# Altium PCB Zotino.PCBDOC (part 2 of 10)
Units mm, origin at the board's own origin, x right, y up, seen from the top; angles counter-clockwise.
Board outline 160.1 x 100.1 mm, 4 copper layers (TopLayer, Internal Plane 2, Signal Layer 1, BottomLayer), stack 1.563 mm thick; 759 components, 378 nets, 2272 pads, 779 vias.
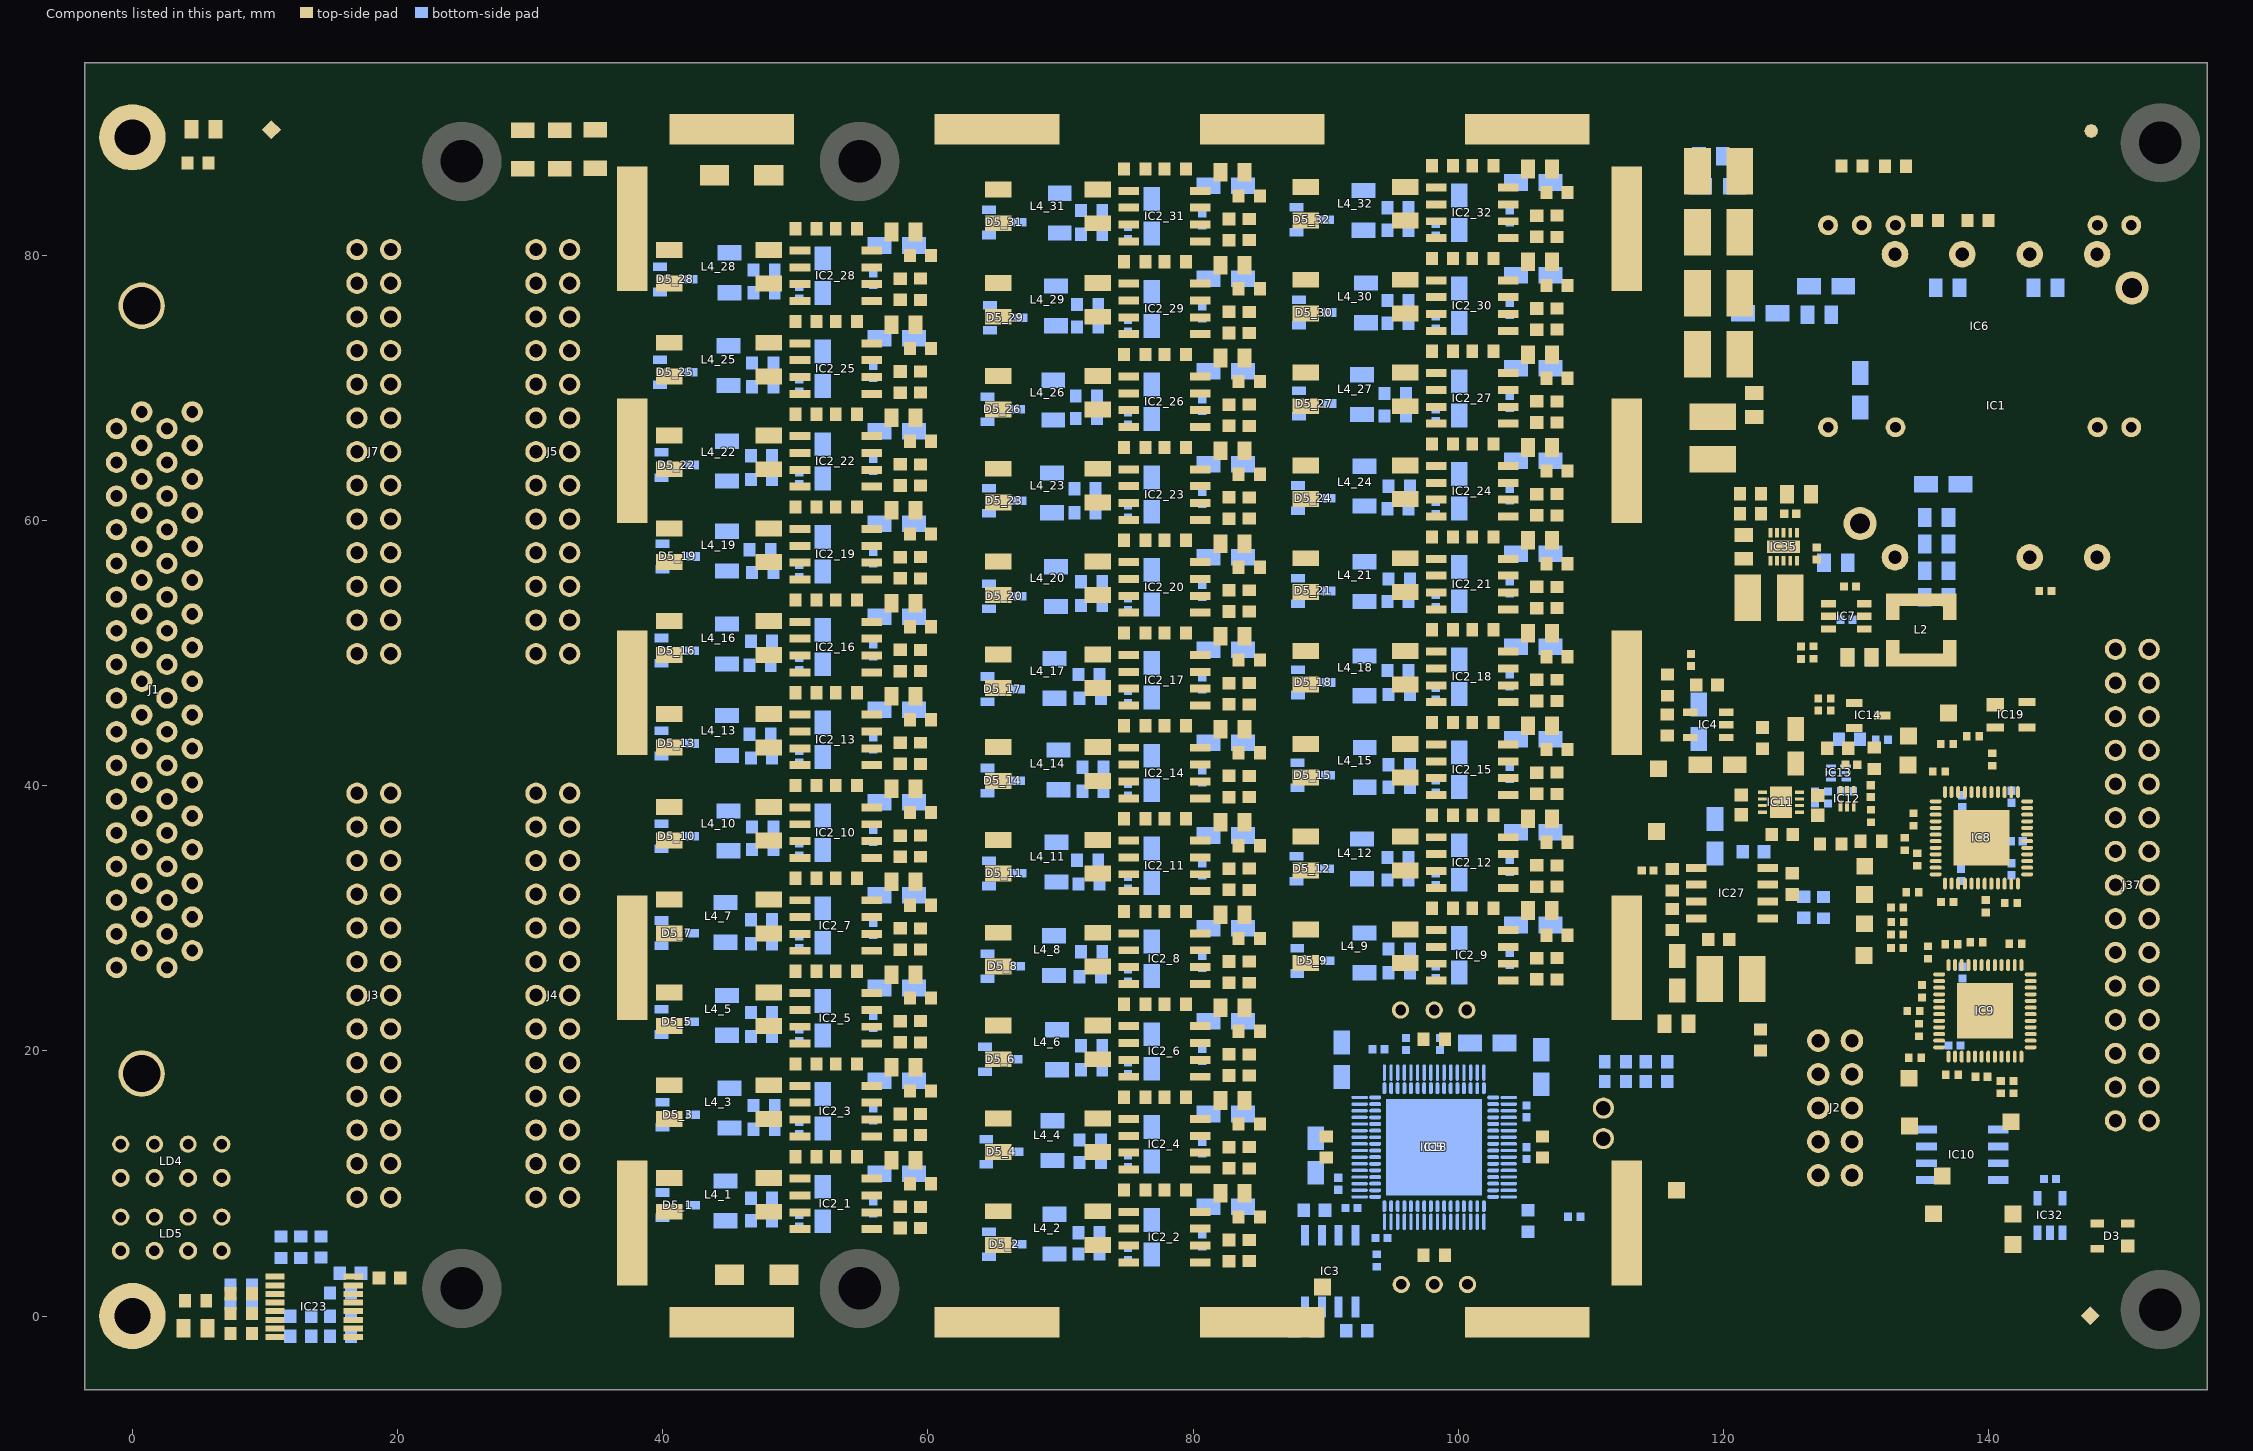
[diagram p4: the components of this part, seen from the top]

## Components (designator, comment, footprint, x,y, rotation, side; value= is the part's Value field where it differs from the comment) (continued)
IC2_5 "OPA197ID" SOIC127P600X175-8N 53.051,22.458 r180 top (schematic designator IC2)
IC2_6 "OPA197ID" SOIC127P600X175-8N 77.851,19.958 r180 top (schematic designator IC2)
IC2_7 "OPA197ID" SOIC127P600X175-8N 53.051,29.458 r180 top (schematic designator IC2)
IC2_8 "OPA197ID" SOIC127P600X175-8N 77.851,26.958 r180 top (schematic designator IC2)
IC2_9 "OPA197ID" SOIC127P600X175-8N 101.051,27.208 r180 top (schematic designator IC2)
IC2_10 "OPA197ID" SOIC127P600X175-8N 53.051,36.458 r180 top (schematic designator IC2)
IC2_11 "OPA197ID" SOIC127P600X175-8N 77.851,33.958 r180 top (schematic designator IC2)
IC2_12 "OPA197ID" SOIC127P600X175-8N 101.051,34.208 r180 top (schematic designator IC2)
IC2_13 "OPA197ID" SOIC127P600X175-8N 53.051,43.458 r180 top (schematic designator IC2)
IC2_14 "OPA197ID" SOIC127P600X175-8N 77.851,40.958 r180 top (schematic designator IC2)
IC2_15 "OPA197ID" SOIC127P600X175-8N 101.051,41.208 r180 top (schematic designator IC2)
IC2_16 "OPA197ID" SOIC127P600X175-8N 53.051,50.458 r180 top (schematic designator IC2)
IC2_17 "OPA197ID" SOIC127P600X175-8N 77.851,47.958 r180 top (schematic designator IC2)
IC2_18 "OPA197ID" SOIC127P600X175-8N 101.051,48.208 r180 top (schematic designator IC2)
IC2_19 "OPA197ID" SOIC127P600X175-8N 53.051,57.458 r180 top (schematic designator IC2)
IC2_20 "OPA197ID" SOIC127P600X175-8N 77.851,54.958 r180 top (schematic designator IC2)
IC2_21 "OPA197ID" SOIC127P600X175-8N 101.051,55.208 r180 top (schematic designator IC2)
IC2_22 "OPA197ID" SOIC127P600X175-8N 53.051,64.458 r180 top (schematic designator IC2)
IC2_23 "OPA197ID" SOIC127P600X175-8N 77.851,61.958 r180 top (schematic designator IC2)
IC2_24 "OPA197ID" SOIC127P600X175-8N 101.051,62.208 r180 top (schematic designator IC2)
IC2_25 "OPA197ID" SOIC127P600X175-8N 53.051,71.458 r180 top (schematic designator IC2)
IC2_26 "OPA197ID" SOIC127P600X175-8N 77.851,68.958 r180 top (schematic designator IC2)
IC2_27 "OPA197ID" SOIC127P600X175-8N 101.051,69.208 r180 top (schematic designator IC2)
IC2_28 "OPA197ID" SOIC127P600X175-8N 53.051,78.458 r180 top (schematic designator IC2)
IC2_29 "OPA197ID" SOIC127P600X175-8N 77.851,75.958 r180 top (schematic designator IC2)
IC2_30 "OPA197ID" SOIC127P600X175-8N 101.051,76.208 r180 top (schematic designator IC2)
IC2_31 "OPA197ID" SOIC127P600X175-8N 77.851,82.958 r180 top (schematic designator IC2)
IC2_32 "OPA197ID" SOIC127P600X175-8N 101.051,83.208 r180 top (schematic designator IC2)
IC3 "MAX6250ACSA+" SOIC127P600X175-8N 90.344,3.388 r90 bottom
IC4 "LT1964ES5-BYP#TRMPBF" SOT95P280X100-5N 118.844,44.588 r180 top
IC5 "AD5373BSTZ" TSQFP50P1200X1200X160-64L 98.176,12.738 r90 bottom locked
IC6 "JHM0612D12" DCDC_XPPOWER_JHM0X 139.192,74.657 r180 top locked
IC7 "AP62201WU-7" SOT95P280X100-6N 129.27,52.773 r180 top
IC8 "SN65MLVD040RGZT" QFN50P700X700X100-49N-S420 139.45,36.069 r0 top
IC9 "SN65MLVD040RGZT" QFN50P700X700X100-49N-S420 139.714,23.022 r0 top
IC10 "24AA02E48-I/SN" SOIC127P600X175-8N 138.006,12.163 r0 bottom
IC11 "LT1964EDD#PBF" LT-DD-8_V 124.334,38.755 r0 top
IC12 "TPS389001DSET" TPS610985DSET 129.317,39.022 r0 top
IC13 "TPS389001DSET" TPS610985DSET 128.68,40.969 r270 bottom
IC14 "LM4040CIM3-5.0" SOT95P237X112-3N 130.906,45.306 r0 top
IC18 "AD5372BCPZ" QFN50P900X900X100-65N-S725 98.176,12.738 r90 bottom locked
IC19 "STM811SW16F" SOT143N 141.694,45.349 r0 top
IC23 "SN74LV595APWT" SOP65P640X120-16N 13.707,0.694 r0 top
IC27 "LT1763CS8#PBF" SOIC127P600X175-8N 120.64,31.905 r0 top
IC32 "24AA02E48T-I/OT" SOT95P280X145-5N 144.628,7.595 r90 bottom
IC35 "TPS62175DQC" SON50P200X300X80-11N-R94X250 124.532,58.019 r270 top
J1 "D-SUB" TYCO_5787082-7 1.657,47.244 r270 top
J2 "Header 10" 3M_N2510-6002RB 128.417,15.696 r270 top locked
J3 "Header 26" 3M_N2526-6002RB 18.207,24.194 r90 top
J4 "Header 26" 3M_N2526-6002RB 31.707,24.194 r90 top
J5 "Header 26" 3M_N2526-6002RB 31.707,65.194 r90 top
J7 "Header 26" 3M_N2526-6002RB 18.207,65.194 r90 top
J37 "" 3M_N2530-6002RB 150.831,32.509 r270 top locked
L1 "10uH" IND_MURATA-PS_8400 120.56,25.423 r180 top
L2 "3.3uH" IND_WURTH_WE-TPC_4828 134.909,51.757 r270 top
L4_1 "2x6.5mH" IND_WURTH_WE-SL2 44.24,9.139 r180 top (schematic designator L4)
L4_2 "2x6.5mH" IND_WURTH_WE-SL2 69.04,6.639 r180 top (schematic designator L4)
L4_3 "2x6.5mH" IND_WURTH_WE-SL2 44.24,16.139 r180 top (schematic designator L4)
L4_4 "2x6.5mH" IND_WURTH_WE-SL2 69.04,13.639 r180 top (schematic designator L4)
L4_5 "2x6.5mH" IND_WURTH_WE-SL2 44.24,23.139 r180 top (schematic designator L4)
L4_6 "2x6.5mH" IND_WURTH_WE-SL2 69.04,20.639 r180 top (schematic designator L4)
L4_7 "2x6.5mH" IND_WURTH_WE-SL2 44.24,30.139 r180 top (schematic designator L4)
L4_8 "2x6.5mH" IND_WURTH_WE-SL2 69.04,27.639 r180 top (schematic designator L4)
L4_9 "2x6.5mH" IND_WURTH_WE-SL2 92.24,27.889 r180 top (schematic designator L4)
L4_10 "2x6.5mH" IND_WURTH_WE-SL2 44.24,37.139 r180 top (schematic designator L4)
L4_11 "2x6.5mH" IND_WURTH_WE-SL2 69.04,34.639 r180 top (schematic designator L4)
L4_12 "2x6.5mH" IND_WURTH_WE-SL2 92.24,34.889 r180 top (schematic designator L4)
L4_13 "2x6.5mH" IND_WURTH_WE-SL2 44.24,44.139 r180 top (schematic designator L4)
L4_14 "2x6.5mH" IND_WURTH_WE-SL2 69.04,41.639 r180 top (schematic designator L4)
L4_15 "2x6.5mH" IND_WURTH_WE-SL2 92.24,41.889 r180 top (schematic designator L4)
L4_16 "2x6.5mH" IND_WURTH_WE-SL2 44.24,51.139 r180 top (schematic designator L4)
L4_17 "2x6.5mH" IND_WURTH_WE-SL2 69.04,48.639 r180 top (schematic designator L4)
L4_18 "2x6.5mH" IND_WURTH_WE-SL2 92.24,48.889 r180 top (schematic designator L4)
L4_19 "2x6.5mH" IND_WURTH_WE-SL2 44.24,58.139 r180 top (schematic designator L4)
L4_20 "2x6.5mH" IND_WURTH_WE-SL2 69.04,55.639 r180 top (schematic designator L4)
L4_21 "2x6.5mH" IND_WURTH_WE-SL2 92.24,55.889 r180 top (schematic designator L4)
L4_22 "2x6.5mH" IND_WURTH_WE-SL2 44.24,65.139 r180 top (schematic designator L4)
L4_23 "2x6.5mH" IND_WURTH_WE-SL2 69.04,62.639 r180 top (schematic designator L4)
L4_24 "2x6.5mH" IND_WURTH_WE-SL2 92.24,62.889 r180 top (schematic designator L4)
L4_25 "2x6.5mH" IND_WURTH_WE-SL2 44.24,72.139 r180 top (schematic designator L4)
L4_26 "2x6.5mH" IND_WURTH_WE-SL2 69.04,69.639 r180 top (schematic designator L4)
L4_27 "2x6.5mH" IND_WURTH_WE-SL2 92.24,69.889 r180 top (schematic designator L4)
L4_28 "2x6.5mH" IND_WURTH_WE-SL2 44.24,79.139 r180 top (schematic designator L4)
L4_29 "2x6.5mH" IND_WURTH_WE-SL2 69.04,76.639 r180 top (schematic designator L4)
L4_30 "2x6.5mH" IND_WURTH_WE-SL2 92.24,76.889 r180 top (schematic designator L4)
L4_31 "2x6.5mH" IND_WURTH_WE-SL2 69.044,83.688 r180 top (schematic designator L4)
L4_32 "2x6.5mH" IND_WURTH_WE-SL2 92.24,83.889 r180 top (schematic designator L4)
L6 "10uH" IND_MURATA-PS_8400 119.637,77.147 r180 top
L7 "10uH" IND_MURATA-PS_8400 119.637,72.55 r0 top
L8 "10uH" IND_MURATA-PS_8400 119.184,66.238 r90 top
L9 "10uH" IND_MURATA-PS_8400 119.637,86.342 r180 top
L15 "10uH" IND_MURATA-PS_8400 119.637,81.745 r0 top
L16 "10uH" IND_MURATA-PS_8400 123.415,54.175 r180 top
LD4 "Green" LED_BIVAR_H485CGDL 2.932,11.694 r0 top
LD5 "Green" LED_BIVAR_H485CGDL 2.932,6.194 r0 top
R1 "Undefined" RESC1608X55N 135.382,82.626 r180 top
R2 "0" RESC1005X40N 144.272,54.686 r180 top
R3 "0" RESC1005X40N 93.844,4.188 r270 bottom
R4 "36k" RESC1608X55N 139.192,82.626 r180 top
R5_1 "1k" RESC1608X55N 47.444,7.188 r180 bottom (schematic designator R5)
R5_2 "1k" RESC1608X55N 72.144,4.688 r180 bottom (schematic designator R5)
R5_3 "1k" RESC1608X55N 47.644,15.888 r180 bottom (schematic designator R5)
R5_4 "1k" RESC1608X55N 72.244,13.288 r180 bottom (schematic designator R5)
R5_5 "1k" RESC1608X55N 47.444,22.888 r180 bottom (schematic designator R5)
R5_6 "1k" RESC1608X55N 72.344,20.388 r180 bottom (schematic designator R5)
R5_7 "1k" RESC1608X55N 47.444,29.888 r180 bottom (schematic designator R5)
R5_8 "1k" RESC1608X55N 72.344,27.488 r180 bottom (schematic designator R5)
R5_9 "1k" RESC1608X55N 95.544,27.69 r180 bottom (schematic designator R5)
R5_10 "1k" RESC1608X55N 47.544,36.888 r180 bottom (schematic designator R5)
R5_11 "1k" RESC1608X55N 72.044,34.388 r180 bottom (schematic designator R5)
R5_12 "1k" RESC1608X55N 95.444,34.588 r180 bottom (schematic designator R5)
R5_13 "1k" RESC1608X55N 47.344,43.888 r180 bottom (schematic designator R5)
R5_14 "1k" RESC1608X55N 72.444,41.388 r180 bottom (schematic designator R5)
R5_15 "1k" RESC1608X55N 95.544,41.588 r180 bottom (schematic designator R5)
R5_16 "1k" RESC1608X55N 47.444,50.888 r180 bottom (schematic designator R5)
R5_17 "1k" RESC1608X55N 72.144,48.388 r180 bottom (schematic designator R5)
R5_18 "1k" RESC1608X55N 95.544,46.888 r180 bottom (schematic designator R5)
R5_19 "1k" RESC1608X55N 47.544,56.088 r180 bottom (schematic designator R5)
R5_20 "1k" RESC1608X55N 72.344,55.388 r180 bottom (schematic designator R5)
R5_21 "1k" RESC1608X55N 95.544,55.588 r180 bottom (schematic designator R5)
R5_22 "1k" RESC1608X55N 47.444,64.888 r180 bottom (schematic designator R5)
R5_23 "1k" RESC1608X55N 71.844,62.388 r180 bottom (schematic designator R5)
R5_24 "1k" RESC1608X55N 95.544,62.588 r180 bottom (schematic designator R5)
R5_25 "1k" RESC1608X55N 47.544,71.888 r180 bottom (schematic designator R5)
R5_26 "1k" RESC1608X55N 71.944,69.388 r180 bottom (schematic designator R5)
R5_27 "1k" RESC1608X55N 95.244,69.588 r180 bottom (schematic designator R5)
R5_28 "1k" RESC1608X55N 47.644,78.888 r180 bottom (schematic designator R5)
R5_29 "1k" RESC1608X55N 72.044,76.288 r180 bottom (schematic designator R5)
R5_30 "1k" RESC1608X55N 95.444,76.588 r180 bottom (schematic designator R5)
R5_31 "1k" RESC1608X55N 72.344,83.388 r180 bottom (schematic designator R5)
R5_32 "1k" RESC1608X55N 95.444,83.588 r180 bottom (schematic designator R5)
R6 "100" RESC1005X40N 141.685,31.163 r0 top
R7_1 "1k" RESC1608X55N 47.444,8.888 r180 bottom (schematic designator R7)
R7_2 "1k" RESC1608X55N 72.144,6.288 r180 bottom (schematic designator R7)
R7_3 "1k" RESC1608X55N 47.644,14.088 r180 bottom (schematic designator R7)
R7_4 "1k" RESC1608X55N 72.244,11.588 r180 bottom (schematic designator R7)
R7_5 "1k" RESC1608X55N 47.444,21.088 r180 bottom (schematic designator R7)
R7_6 "1k" RESC1608X55N 72.344,18.588 r180 bottom (schematic designator R7)
R7_7 "1k" RESC1608X55N 47.444,28.088 r180 bottom (schematic designator R7)
R7_8 "1k" RESC1608X55N 72.244,25.588 r180 bottom (schematic designator R7)
R7_9 "1k" RESC1608X55N 95.544,25.888 r180 bottom (schematic designator R7)
R7_10 "1k" RESC1608X55N 47.544,35.188 r180 bottom (schematic designator R7)
R7_11 "1k" RESC1608X55N 72.144,32.588 r180 bottom (schematic designator R7)
R7_12 "1k" RESC1608X55N 95.444,32.888 r180 bottom (schematic designator R7)
R7_13 "1k" RESC1608X55N 47.444,42.088 r180 bottom (schematic designator R7)
R7_14 "1k" RESC1608X55N 72.444,39.588 r180 bottom (schematic designator R7)
R7_15 "1k" RESC1608X55N 95.544,39.888 r180 bottom (schematic designator R7)
R7_16 "1k" RESC1608X55N 47.344,49.088 r180 bottom (schematic designator R7)
R7_17 "1k" RESC1608X55N 72.244,46.588 r180 bottom (schematic designator R7)
R7_18 "1k" RESC1608X55N 95.444,48.688 r180 bottom (schematic designator R7)
R7_19 "1k" RESC1608X55N 47.344,57.788 r180 bottom (schematic designator R7)
R7_20 "1k" RESC1608X55N 72.344,53.588 r180 bottom (schematic designator R7)
R7_21 "1k" RESC1608X55N 95.444,53.888 r180 bottom (schematic designator R7)
R7_22 "1k" RESC1608X55N 47.444,63.088 r180 bottom (schematic designator R7)
R7_23 "1k" RESC1608X55N 71.844,60.588 r180 bottom (schematic designator R7)
R7_24 "1k" RESC1608X55N 95.444,60.888 r180 bottom (schematic designator R7)
R7_25 "1k" RESC1608X55N 47.544,70.088 r180 bottom (schematic designator R7)
R7_26 "1k" RESC1608X55N 71.944,67.688 r180 bottom (schematic designator R7)
R7_27 "1k" RESC1608X55N 95.244,67.888 r180 bottom (schematic designator R7)
R7_28 "1k" RESC1608X55N 47.644,77.188 r180 bottom (schematic designator R7)
R7_29 "1k" RESC1608X55N 72.044,74.588 r180 bottom (schematic designator R7)
R7_30 "1k" RESC1608X55N 95.444,74.888 r180 bottom (schematic designator R7)
R7_31 "1k" RESC1608X55N 72.344,81.588 r180 bottom (schematic designator R7)
R7_32 "1k" RESC1608X55N 95.444,81.888 r180 bottom (schematic designator R7)
R8 "220" RESC1608X55N 98.181,4.588 r0 top
R9 "220" RESC1608X55N 90.044,12.747 r90 top
R10 "220" RESC1608X55N 98.181,20.888 r0 top
R11 "0" RESC1005X40N 136.859,43.152 r0 top
R12 "220" RESC1608X55N 106.344,12.747 r270 top
R13 "0" RESC1005X40N 138.823,43.738 r0 top
R14 "0" RESC1005X40N 133.125,29.715 r0 top
R15 "Undefined" RESC1608X55N 122.783,20.816 r90 top
R16 "100" RESC1005X40N 140.271,41.981 r270 top
R17 "100" RESC1005X40N 133.673,35.605 r90 top
R18 "100" RESC1005X40N 139.78,30.909 r90 top
R19 "100" RESC1005X40N 134.251,31.973 r0 top
R20 "100" RESC1005X40N 135.411,27.429 r270 top
R21 "100" RESC1005X40N 139.069,28.191 r0 top
R22 "100" RESC1005X40N 134.319,23.01 r0 top
R23 "100" RESC1005X40N 140.906,17.267 r90 top
R24_1 "2k32" RESC1608X55N 59.436,9.982 r180 top (schematic designator R24)
R24_2 "2k32" RESC1608X55N 84.236,7.482 r180 top (schematic designator R24)
R24_3 "2k32" RESC1608X55N 59.436,16.982 r180 top (schematic designator R24)
R24_4 "2k32" RESC1608X55N 84.236,14.482 r180 top (schematic designator R24)
R24_5 "2k32" RESC1608X55N 59.436,23.982 r180 top (schematic designator R24)
R24_6 "2k32" RESC1608X55N 84.236,21.482 r180 top (schematic designator R24)
R24_7 "2k32" RESC1608X55N 59.436,30.982 r180 top (schematic designator R24)
R24_8 "2k32" RESC1608X55N 84.236,28.482 r180 top (schematic designator R24)
R24_9 "2k32" RESC1608X55N 107.436,28.732 r180 top (schematic designator R24)
R24_10 "2k32" RESC1608X55N 59.436,37.982 r180 top (schematic designator R24)
R24_11 "2k32" RESC1608X55N 84.236,35.482 r180 top (schematic designator R24)
R24_12 "2k32" RESC1608X55N 107.436,35.732 r180 top (schematic designator R24)
R24_13 "2k32" RESC1608X55N 59.436,44.982 r180 top (schematic designator R24)
R24_14 "2k32" RESC1608X55N 84.236,42.482 r180 top (schematic designator R24)
R24_15 "2k32" RESC1608X55N 107.436,42.732 r180 top (schematic designator R24)
R24_16 "2k32" RESC1608X55N 59.436,51.982 r180 top (schematic designator R24)
R24_17 "2k32" RESC1608X55N 84.236,49.482 r180 top (schematic designator R24)
R24_18 "2k32" RESC1608X55N 107.436,49.732 r180 top (schematic designator R24)
R24_19 "2k32" RESC1608X55N 59.436,58.982 r180 top (schematic designator R24)
R24_20 "2k32" RESC1608X55N 84.236,56.482 r180 top (schematic designator R24)
R24_21 "2k32" RESC1608X55N 107.436,56.732 r180 top (schematic designator R24)
R24_22 "2k32" RESC1608X55N 59.436,65.982 r180 top (schematic designator R24)
R24_23 "2k32" RESC1608X55N 84.236,63.482 r180 top (schematic designator R24)
R24_24 "2k32" RESC1608X55N 107.436,63.732 r180 top (schematic designator R24)
R24_25 "2k32" RESC1608X55N 59.436,72.982 r180 top (schematic designator R24)
R24_26 "2k32" RESC1608X55N 84.236,70.482 r180 top (schematic designator R24)
R24_27 "2k32" RESC1608X55N 107.436,70.732 r180 top (schematic designator R24)
R24_28 "2k32" RESC1608X55N 59.436,79.982 r180 top (schematic designator R24)
R24_29 "2k32" RESC1608X55N 84.236,77.482 r180 top (schematic designator R24)
R24_30 "2k32" RESC1608X55N 107.436,77.732 r180 top (schematic designator R24)
R24_31 "2k32" RESC1608X55N 84.236,84.482 r180 top (schematic designator R24)
R24_32 "2k32" RESC1608X55N 107.436,84.732 r180 top (schematic designator R24)
R25_1 "9k09" RESC1608X55N 59.436,7.442 r270 top (schematic designator R25)
R25_2 "9k09" RESC1608X55N 84.236,4.942 r270 top (schematic designator R25)
R25_3 "9k09" RESC1608X55N 59.436,14.442 r270 top (schematic designator R25)
R25_4 "9k09" RESC1608X55N 84.236,11.942 r270 top (schematic designator R25)
R25_5 "9k09" RESC1608X55N 59.436,21.442 r270 top (schematic designator R25)
R25_6 "9k09" RESC1608X55N 84.236,18.942 r270 top (schematic designator R25)
R25_7 "9k09" RESC1608X55N 59.436,28.442 r270 top (schematic designator R25)
R25_8 "9k09" RESC1608X55N 84.236,25.942 r270 top (schematic designator R25)
R25_9 "9k09" RESC1608X55N 107.436,26.192 r270 top (schematic designator R25)
R25_10 "9k09" RESC1608X55N 59.436,35.442 r270 top (schematic designator R25)
R25_11 "9k09" RESC1608X55N 84.236,32.942 r270 top (schematic designator R25)
R25_12 "9k09" RESC1608X55N 107.436,33.192 r270 top (schematic designator R25)
R25_13 "9k09" RESC1608X55N 59.436,42.442 r270 top (schematic designator R25)
R25_14 "9k09" RESC1608X55N 84.236,39.942 r270 top (schematic designator R25)
R25_15 "9k09" RESC1608X55N 107.436,40.192 r270 top (schematic designator R25)
R25_16 "9k09" RESC1608X55N 59.436,49.442 r270 top (schematic designator R25)
R25_17 "9k09" RESC1608X55N 84.236,46.942 r270 top (schematic designator R25)
R25_18 "9k09" RESC1608X55N 107.436,47.192 r270 top (schematic designator R25)
R25_19 "9k09" RESC1608X55N 59.436,56.442 r270 top (schematic designator R25)
R25_20 "9k09" RESC1608X55N 84.236,53.942 r270 top (schematic designator R25)
R25_21 "9k09" RESC1608X55N 107.436,54.192 r270 top (schematic designator R25)
R25_22 "9k09" RESC1608X55N 59.436,63.442 r270 top (schematic designator R25)
R25_23 "9k09" RESC1608X55N 84.236,60.942 r270 top (schematic designator R25)
R25_24 "9k09" RESC1608X55N 107.436,61.192 r270 top (schematic designator R25)
R25_25 "9k09" RESC1608X55N 59.436,70.442 r270 top (schematic designator R25)
R25_26 "9k09" RESC1608X55N 84.236,67.942 r270 top (schematic designator R25)
R25_27 "9k09" RESC1608X55N 107.436,68.192 r270 top (schematic designator R25)
R25_28 "9k09" RESC1608X55N 59.436,77.442 r270 top (schematic designator R25)
R25_29 "9k09" RESC1608X55N 84.236,74.942 r270 top (schematic designator R25)
R25_30 "9k09" RESC1608X55N 107.436,75.192 r270 top (schematic designator R25)
R25_31 "9k09" RESC1608X55N 84.236,81.942 r270 top (schematic designator R25)
R25_32 "9k09" RESC1608X55N 107.436,82.192 r270 top (schematic designator R25)
R26 "Undefined" RESC1608X55N 132.976,86.719 r0 top
R27 "12k7" RESC1608X55N 129.687,86.732 r0 top
R28 "0" RESC1608X55N 4.944,86.967 r180 top
R29 "0" RESC1608X55N 4.768,1.161 r180 top
R30 "Undefined" RESC3216X65N 34.906,88.019 r270 top
R31 "Undefined" RESC3216X65N 32.229,87.988 r270 top
R32 "Undefined" RESC3216X65N 29.444,87.988 r270 top
R33 "31k6" RESC1005X35N 125.844,50.03 r270 top
R34 "10k" RESC1005X40N 126.794,50.041 r90 top
R35 "24k" RESC1608X55N 131.361,42.073 r90 top
R36 "10k" RESC1005X40N 127.608,45.676 r180 top
R37 "0" RESC1005X40N 131.117,37.72 r90 top
R38 "10k" RESC1005X40N 131.939,43.475 r0 bottom
R39 "24k" RESC1608X55N 127.537,30.806 r270 bottom
R40 "1k" RESC1608X55N 129.503,43.5 r0 bottom
R41 "0" RESC1005X40N 129.304,39.578 r180 bottom
R42 "0" RESC1005X40N 127.608,46.571 r0 top
R43 "24k" RESC1608X55N 128.083,35.598 r180 top
R44 "2k7" RESC1608X55N 131.133,35.804 r180 top
R51 "0" RESC1005X40N 108.744,7.488 r0 bottom
R58 "220" RESC1608X55N 15.694,1.738 r0 bottom
R67_1 "11k" RESC1608X55N 50.8,12.014 r180 top (schematic designator R67)
R67_2 "11k" RESC1608X55N 75.6,9.514 r180 top (schematic designator R67)
R67_3 "11k" RESC1608X55N 50.8,19.014 r180 top (schematic designator R67)
R67_4 "11k" RESC1608X55N 75.6,16.514 r180 top (schematic designator R67)
R67_5 "11k" RESC1608X55N 50.8,26.014 r180 top (schematic designator R67)
R67_6 "11k" RESC1608X55N 75.6,23.514 r180 top (schematic designator R67)
R67_7 "11k" RESC1608X55N 50.8,33.014 r180 top (schematic designator R67)
R67_8 "11k" RESC1608X55N 75.6,30.514 r180 top (schematic designator R67)
R67_9 "11k" RESC1608X55N 98.8,30.764 r180 top (schematic designator R67)
R67_10 "11k" RESC1608X55N 50.8,40.014 r180 top (schematic designator R67)
R67_11 "11k" RESC1608X55N 75.6,37.514 r180 top (schematic designator R67)
R67_12 "11k" RESC1608X55N 98.8,37.764 r180 top (schematic designator R67)
R67_13 "11k" RESC1608X55N 50.8,47.014 r180 top (schematic designator R67)
R67_14 "11k" RESC1608X55N 75.6,44.514 r180 top (schematic designator R67)
R67_15 "11k" RESC1608X55N 98.8,44.764 r180 top (schematic designator R67)
R67_16 "11k" RESC1608X55N 50.8,54.014 r180 top (schematic designator R67)
R67_17 "11k" RESC1608X55N 75.6,51.514 r180 top (schematic designator R67)
R67_18 "11k" RESC1608X55N 98.8,51.764 r180 top (schematic designator R67)
R67_19 "11k" RESC1608X55N 50.8,61.014 r180 top (schematic designator R67)
R67_20 "11k" RESC1608X55N 75.6,58.514 r180 top (schematic designator R67)
R67_21 "11k" RESC1608X55N 98.8,58.764 r180 top (schematic designator R67)
R67_22 "11k" RESC1608X55N 50.8,68.014 r180 top (schematic designator R67)
R67_23 "11k" RESC1608X55N 75.6,65.514 r180 top (schematic designator R67)
R67_24 "11k" RESC1608X55N 98.8,65.764 r180 top (schematic designator R67)
R67_25 "11k" RESC1608X55N 50.8,75.014 r180 top (schematic designator R67)
R67_26 "11k" RESC1608X55N 75.6,72.514 r180 top (schematic designator R67)
R67_27 "11k" RESC1608X55N 98.8,72.764 r180 top (schematic designator R67)
R67_28 "11k" RESC1608X55N 50.8,82.014 r180 top (schematic designator R67)
R67_29 "11k" RESC1608X55N 75.6,79.514 r180 top (schematic designator R67)
R67_30 "11k" RESC1608X55N 98.8,79.764 r180 top (schematic designator R67)
R67_31 "11k" RESC1608X55N 75.6,86.514 r180 top (schematic designator R67)
R67_32 "11k" RESC1608X55N 98.8,86.764 r180 top (schematic designator R67)
R68_1 "Undefined" RESC1608X55N 53.848,12.014 r180 top (schematic designator R68)
R68_2 "Undefined" RESC1608X55N 78.648,9.514 r180 top (schematic designator R68)
R68_3 "Undefined" RESC1608X55N 53.848,19.014 r180 top (schematic designator R68)
R68_4 "Undefined" RESC1608X55N 78.648,16.514 r180 top (schematic designator R68)
R68_5 "Undefined" RESC1608X55N 53.848,26.014 r180 top (schematic designator R68)
R68_6 "Undefined" RESC1608X55N 78.648,23.514 r180 top (schematic designator R68)
R68_7 "Undefined" RESC1608X55N 53.848,33.014 r180 top (schematic designator R68)
R68_8 "Undefined" RESC1608X55N 78.648,30.514 r180 top (schematic designator R68)
R68_9 "Undefined" RESC1608X55N 101.848,30.764 r180 top (schematic designator R68)
R68_10 "Undefined" RESC1608X55N 53.848,40.014 r180 top (schematic designator R68)
R68_11 "Undefined" RESC1608X55N 78.648,37.514 r180 top (schematic designator R68)
R68_12 "Undefined" RESC1608X55N 101.848,37.764 r180 top (schematic designator R68)
R68_13 "Undefined" RESC1608X55N 53.848,47.014 r180 top (schematic designator R68)
R68_14 "Undefined" RESC1608X55N 78.648,44.514 r180 top (schematic designator R68)
R68_15 "Undefined" RESC1608X55N 101.848,44.764 r180 top (schematic designator R68)
R68_16 "Undefined" RESC1608X55N 53.848,54.014 r180 top (schematic designator R68)
R68_17 "Undefined" RESC1608X55N 78.648,51.514 r180 top (schematic designator R68)
R68_18 "Undefined" RESC1608X55N 101.848,51.764 r180 top (schematic designator R68)
R68_19 "Undefined" RESC1608X55N 53.848,61.014 r180 top (schematic designator R68)
R68_20 "Undefined" RESC1608X55N 78.648,58.514 r180 top (schematic designator R68)
R68_21 "Undefined" RESC1608X55N 101.848,58.764 r180 top (schematic designator R68)
R68_22 "Undefined" RESC1608X55N 53.848,68.014 r180 top (schematic designator R68)
R68_23 "Undefined" RESC1608X55N 78.648,65.514 r180 top (schematic designator R68)
R68_24 "Undefined" RESC1608X55N 101.848,65.764 r180 top (schematic designator R68)
R68_25 "Undefined" RESC1608X55N 53.848,75.014 r180 top (schematic designator R68)
R68_26 "Undefined" RESC1608X55N 78.648,72.514 r180 top (schematic designator R68)
R68_27 "Undefined" RESC1608X55N 101.848,72.764 r180 top (schematic designator R68)
R68_28 "Undefined" RESC1608X55N 53.848,82.014 r180 top (schematic designator R68)
R68_29 "Undefined" RESC1608X55N 78.648,79.514 r180 top (schematic designator R68)
R68_30 "Undefined" RESC1608X55N 101.848,79.764 r180 top (schematic designator R68)
R68_31 "Undefined" RESC1608X55N 78.648,86.514 r180 top (schematic designator R68)
R68_32 "Undefined" RESC1608X55N 101.848,86.764 r180 top (schematic designator R68)
R69 "24k" RESC1608X55N 115.752,44.582 r270 top
R70 "2k7" RESC1608X55N 115.766,47.588 r270 top
R82 "220" RESC1608X55N 15.694,-1.512 r0 bottom
R88 "0" RESC1005X40N 134.444,19.488 r0 top
R97 "0" RESC1005X40N 133.096,30.81 r0 top
R99 "0" RESC1005X40N 133.096,27.762 r0 top
R101 "0" RESC1005X40N 133.096,28.778 r0 top
R113 "220" RESC1608X55N 14.224,5.207 r90 bottom
R114 "220" RESC1608X55N 11.207,5.194 r90 bottom
R115 "220" RESC1608X55N 12.707,5.194 r90 bottom
R116 "220" RESC1608X55N 111.844,17.688 r180 bottom
R117 "220" RESC1608X55N 111.844,19.191 r180 bottom
R118 "220" RESC1608X55N 15.694,-0.012 r0 bottom
R119 "220" RESC1608X55N 8.207,2.344 r180 bottom
R120 "220" RESC1608X55N 8.207,0.944 r180 bottom
R121 "220" RESC1608X55N 8.207,1.694 r180 top
R122 "220" RESC1608X55N 8.207,0.194 r180 top
R123 "220" RESC1608X55N 8.207,-1.306 r180 top
R141 "100" RESC1005X40N 136.257,41.067 r180 top
R144 "100" RESC1005X40N 134.327,37.46 r270 top
R147 "100" RESC1005X40N 134.606,34.437 r270 top
R150 "24k" RESC1608X55N 116.14,32.905 r90 top
R151 "100" RESC1005X40N 136.867,31.237 r0 top
R153 "2k7" RESC1608X55N 116.14,29.905 r90 top
R157 "100" RESC1005X40N 141.871,17.267 r270 top
R160 "100" RESC1005X40N 137.199,28.051 r180 top
R162 "270k" RESC1608X55N 122.032,60.519 r180 top
R163 "100" RESC1005X40N 134.964,24.495 r270 top
R164 "82k" RESC1608X55N 122.032,62.019 r0 top
R166 "100" RESC1005X40N 134.736,21.574 r270 top
R170 "100" RESC1005X40N 137.225,18.196 r0 top
R171 "10k" RESC1005X40N 142.015,28.09 r0 top
RT1 "10k" THERMC1608X90N 105.259,7.176 r90 bottom
SCREW1 "2 -56 UNC" TYCO_786585-2 -5.958,18.196 r180 top locked
SCREW2 "2 -56 UNC" TYCO_786585-2 -5.976,76.238 r180 top locked
TEC1 "CP20147H" TEC_CP20147H 98.176,12.738 r0 top
TP1 "Test Point" TPS127 133.919,41.567 r0 top
TP2 "Test Point" TPS127 133.944,43.738 r0 top
TP3 "Test Point" TPS127 130.644,29.588 r0 top
TP4 "Test Point" TPS127 130.644,31.788 r0 top
TP5 "Test Point" TPS127 89.744,2.188 r0 top
TP6 "Test Point" TPS127 135.837,7.715 r0 top
TP7 "Test Point" TPS127 130.653,33.921 r0 top
TP8 "Test Point" TPS127 114.944,36.54 r0 top
TP9 "Test Point" TPS127 115.102,41.28 r0 top
TP10 "Test Point" TPS127 134.019,14.338 r90 top
TP11 "Test Point" TPS127 141.844,7.688 r90 top
TP12 "Test Point" TPS127 141.844,5.388 r90 top
TP13 "Test Point" TPS127 136.494,10.563 r90 top
TP14 "Test Point" TPS127 141.669,14.663 r90 top
TP15 "Test Point" TPS127 133.994,17.938 r90 top
TP16 "Test Point" TPS127 136.964,45.493 r90 top
TP17 "Test Point" TPS127 130.594,27.188 r90 top
TP18 "Test Point" TPS127 116.444,9.488 r90 top

## Footprints (in the part's own frame and the unit in brackets; to place one, negate y for a bottom-side part, rotate by r counter-clockwise, add the part's x,y. Pads: shape width x height; smd on the part's side, far side on the other; paste and mask are expansions set on the pad)
3M_N2510-6002RB [mm] "10 Contacts - Straight .100\" x .100\" Low Profile Four-Wall Header"
  round 1.7 hole 1: 1(-5.08,-1.27) 2(-5.08,1.27) 3(-2.54,-1.27) 4(-2.54,1.27) 5(0,-1.27) 6(0,1.27) 7(2.54,-1.27) 8(2.54,1.27) 9(5.08,-1.27) 10(5.08,1.27)
  silkscreen extent -10.01,-4.85 10.01,4.52, body extent -10.01,-4.11 10.01,4.52, height 9.91
3M_N2526-6002RB [mm] "26 Contacts - Straight .100\" x .100\" Low Profile Four-Wall Header"
  round 1.6 hole 1: 1(-15.24,-1.27) 2(-15.24,1.27) 3(-12.7,-1.27) 4(-12.7,1.27) 5(-10.16,-1.27) 6(-10.16,1.27) 7(-7.62,-1.27) 8(-7.62,1.27) 9(-5.08,-1.27) 10(-5.08,1.27) 11(-2.54,-1.27) 12(-2.54,1.27) 13(0,-1.27) 14(0,1.27) 15(2.54,-1.27) 16(2.54,1.27) 17(5.08,-1.27) 18(5.08,1.27) 19(7.62,-1.27) 20(7.62,1.27) 21(10.16,-1.27) 22(10.16,1.27) 23(12.7,-1.27) 24(12.7,1.27) 25(15.24,-1.27) 26(15.24,1.27)
  silkscreen extent -20.17,-4.85 20.17,4.52, body extent -20.17,-4.11 20.17,4.52, height 9.91
3M_N2530-6002RB [mm] "30 Contacts - Straight .100\" x .100\" Low Profile Four-Wall Header"
  round 1.6 hole 1: 1(-17.78,-1.27) 2(-17.78,1.27) 3(-15.24,-1.27) 4(-15.24,1.27) 5(-12.7,-1.27) 6(-12.7,1.27) 7(-10.16,-1.27) 8(-10.16,1.27) 9(-7.62,-1.27) 10(-7.62,1.27) 11(-5.08,-1.27) 12(-5.08,1.27) 13(-2.54,-1.27) 14(-2.54,1.27) 15(0,-1.27) 16(0,1.27) 17(2.54,-1.27) 18(2.54,1.27) 19(5.08,-1.27) 20(5.08,1.27) 21(7.62,-1.27) 22(7.62,1.27) 23(10.16,-1.27) 24(10.16,1.27) 25(12.7,-1.27) 26(12.7,1.27) 27(15.24,-1.27) 28(15.24,1.27) 29(17.78,-1.27) 30(17.78,1.27)
  silkscreen extent -22.71,-4.85 22.71,4.52, body extent -22.71,-4.11 22.71,4.52, height 9.91
c130h80 [mm] "Plated Through Hole: Hole Dia.=0.8mm Pad Dia.=1.30mm, , IPC-7251 Level C"
  round 1.3 hole 0.8: 1(0,0)
  silkscreen extent -1,-1 1,1
c160h110 [mm] "Plated Through Hole: Hole Dia.=1.1mm Pad Dia.=1.6mm, IPC-7251 Level C"
  round 1.6 hole 1.1: 1(0,0)
  silkscreen extent -1.15,-1.15 1.15,1.15
CAPC1005X55N [mm] "Chip Capacitor, Body 1.0x0.55mm, IPC Medium Density"
  rect 0.62x0.62 smd: 1(-0.45,0) 2(0.45,0)
  body extent -0.52,-0.27 0.53,0.28, height 0.55
CAPC1608X80N [mm] "Chip Capacitor, Body 1.6x0.8mm IPC Medium Density"
  rect 1x1 smd: 1(-0.75,0) 2(0.75,0)
  body extent -0.87,-0.47 0.88,0.48, height 0.8
CAPC1608X87N [mm] "Chip Capacitor, Body 1.6x0.8mm IPC Medium Density"
  rect 0.95x1 smd: 1(-0.8,0) 2(0.8,0)
  body extent -0.87,-0.47 0.88,0.48, height 0.87
CAPC2012X135N [mm] "Chip Capacitor, Body 2.0x1.25mm, IPC Medium Density"
  rect 1.05x1.4 smd: 1(-0.9,0) 2(0.9,0)
  silkscreen extent 0,-0.58 0,0.58, body extent -1.05,-0.67 1.05,0.68, height 1.25
CAPC3216X140N [mm] "Chip Capacitor, Body 3.2x1.6mm, IPC Medium Density"
  rect 1.15x1.8 smd: 1(-1.5,0) 2(1.5,0)
  silkscreen extent -0.5,-0.9 0.5,0.9, body extent -1.7,-0.9 1.7,0.9, height 1.4
CAPMP3216X180N [mm] "Capacitor, Polarized, Molded  Body 3.2x1.6mm, IPC Medium Density"
  rect 1.8x1.25 smd: 1(-1.3,0) 2(1.3,0)
  silkscreen extent -2.4,-0.7 0,1.2, body extent -1.7,-0.9 1.7,0.9, height 1.6
CC6-1212DF-E [mm]
  round 2 hole 1: 1(-2.54,-2.63) 2(-2.54,-12.79) 3(-2.54,-17.87) 4(20.32,-17.87) 5(20.32,-12.79) 6(20.32,-7.71) 7(20.32,-2.63)
  round 2.5 hole 1.5: 8(0,0) 9(17.78,-20.5)
  silkscreen extent -4.06,-20.83 20.44,0.25, body extent -2.72,-20.81 20.44,0.29, height 8.4
CLIP_HOLLAND-SHIELDING_LC [mm] "Surface Mount Clip for PCB Screening Covers"
  rect 9.4x2.3 smd: 1(0,0)
  silkscreen extent -4.7,-1.5 4.7,1.5, body extent -4.4,-1.15 4.4,1.15, height 3.5
DCDC_XPPOWER_JHM0X [mm] "JHM Series , Body 31.75 x 20.32mm"
  round 1.5 hole 0.8: 2(-11.555,-7.62) 3(-9.015,-7.62) 9(6.225,-7.62) 10(8.765,-7.62) 11(11.305,-7.62) 14(11.305,7.62) 16(6.225,7.62) 22(-9.015,7.62) 23(-11.555,7.62)
  silkscreen extent -15.88,-11.01 15.88,10.16, body extent -15.88,-10.16 15.88,10.16, height 10.4
DIOM5126X265N [mm] "DO-214-AC/SMA Molded Diode, 2-Leads, Body 5.1x2.6mm, IPC Medium Density"
  rect 2.2x1.55 smd: 1(-2.05,0) 2(2.05,0)
  silkscreen extent -3.48,-1.45 2.7,1.47, body extent -2.67,-1.45 2.68,1.45, height 2.65
FIDUCIAL_TOP_C100-200 [mm] "Round Fiducial Target, Top Layer, 1.0mm, Top Solder 2.0mm, Keepout =2.0mm"
  round 1 smd paste-0.51 mask+0.5: FTG2(0,0)
  TopLayer keep-out circle w0.1: c0,0 r1
FIDUCIAL_TOP_S100-200 [mm] "Square Fiducial Target, Top Layer, 1.0mm, Top Solder 2.0mm, Keepout =2.0mm"
  rect 1x1 smd rot 45 paste-0.51 mask+0.5: 1(0,0)
  TopLayer keep-out region: 1.414,0 0,-1.414 -1.414,0 0,1.414
HSINK_ATS_ATS-56001-C3-R0 [mm]
  silkscreen extent -9.13,-11.74 9.12,11.76, body extent -13.1,-9.55 13.2,9.45, height 12
IND_MURATA-PS_8400 [mm] "Miniature Surface Mount Power Inductors, 4.5mm L X 3.3mm W X 2.9mm H, MURATA 8400 Series"
  rect 2x3.5 smd: 1(-1.6,0) 2(1.6,0)
  silkscreen extent -0.3,-1.8 0.3,1.8, body extent -2.4,-1.8 2.4,1.8, height 2.9
IND_WURTH_WE-SL2 [mm] "Common Mode SMD Line Filter WE-SL2"
  rect 2x1.2 smd: 1(-3.75,1.27) 2(-3.75,-1.27) 3(3.75,-1.27) 4(3.75,1.27)
  silkscreen extent -4.75,-3.15 4.75,3.15, body extent -4.75,-3.15 4.75,3.15, height 5.3
IND_WURTH_WE-TPC_4828 [mm] "Shielded Tiny Power Inductor, Body 4.8x4.8mm"
  rect 0.95x5.3 smd: 1(-2.275,0) 2(2.275,0)
  rect 1.05x1.014 smd: 1(-1.275,2.143) 1(-1.275,-2.143) 2(1.275,-2.143) 2(1.275,2.143)
  TopLayer region: 0.75,-2.65 2.75,-2.65 2.75,2.65 0.75,2.65 0.75,1.636 1.394,1.138 1.753,0.407 1.753,-0.407 1.394,-1.138 0.75,-1.636 0.75,-1.636
  TopLayer region: -2.75,-2.65 -0.75,-2.65 -0.75,-1.636 -1.394,-1.138 -1.753,-0.407 -1.753,0.407 -1.394,1.138 -0.75,1.636 -0.75,1.636 -0.75,2.65 -2.75,2.65
  TopLayer region: 2.75,-2.65 0.75,-2.65 0.75,-1.636 1.394,-1.138 1.753,-0.407 1.753,0.407 1.394,1.138 0.75,1.636 0.75,1.636 0.75,2.65 2.75,2.65
  silkscreen extent -0.35,-2.4 0.35,2.4, body extent -2.4,-2.4 2.4,2.4, height 2.8
LED_BIVAR_H485CGDL [mm] "Quad-Level 2mm Green, PCB Edge Mounting  BIVAR H485CGDL"
  round 1.35 hole 0.8: 1(-3.81,-1.27) 3(-1.27,-1.27) 5(1.27,-1.27) 7(3.81,-1.27)
  round 1.3 hole 0.8: 2(-3.81,1.27) 4(-1.27,1.27) 6(1.27,1.27) 8(3.81,1.27)
  silkscreen extent -9.99,-2.55 4.71,2.55, body extent -9.99,-2.55 4.71,2.55, height 11.3
LT-DD-8_V [mm] "SON, 8-Leads, Body 3x3mm, Pitch 0.5mm, Thermal Pad 1.65x2.38 mm, IPC Low Density"
  rect 0.7x0.25 smd mask+0.102: 1(-1.4,0.75) 2(-1.4,0.25) 3(-1.4,-0.25) 4(-1.4,-0.75) 5(1.4,-0.75) 6(1.4,-0.25) 7(1.4,0.25) 8(1.4,0.75)
  rect 1.65x2.38 smd mask+0.102: 9(0,0)
  silkscreen extent -2,-1.55 1.55,1.6, body extent -1.5,-1.5 1.5,1.5, height 0.8
MTG270_500 [mm] "Plated Through Hole: Hole Dia.=2.7mm Pad Dia.=5.0mm"
  round 5 hole 2.7: 1(0,0)
QFN50P700X700X100-49N-S420 [mm] "QFN, 0.50mm Pitch, Square; 48 Pin, 7.00mm L X 7.00mm W X 1mm H body (W/Thermal Tab 4.2mm X 4.2mm), IPC Medium Density"
  oval 0.9x0.3 smd: 1(-3.45,2.75) 2(-3.45,2.25) 3(-3.45,1.75) 4(-3.45,1.25) 5(-3.45,0.75) 6(-3.45,0.25) 7(-3.45,-0.25) 8(-3.45,-0.75) 9(-3.45,-1.25) 10(-3.45,-1.75) 11(-3.45,-2.25) 12(-3.45,-2.75) 25(3.45,-2.75) 26(3.45,-2.25) 27(3.45,-1.75) 28(3.45,-1.25) 29(3.45,-0.75) 30(3.45,-0.25) 31(3.45,0.25) 32(3.45,0.75) 33(3.45,1.25) 34(3.45,1.75) 35(3.45,2.25) 36(3.45,2.75)
  oval 0.3x0.9 smd: 13(-2.75,-3.45) 14(-2.25,-3.45) 15(-1.75,-3.45) 16(-1.25,-3.45) 17(-0.75,-3.45) 18(-0.25,-3.45) 19(0.25,-3.45) 20(0.75,-3.45) 21(1.25,-3.45) 22(1.75,-3.45) 23(2.25,-3.45) 24(2.75,-3.45) 37(2.75,3.45) 38(2.25,3.45) 39(1.75,3.45) 40(1.25,3.45) 41(0.75,3.45) 42(0.25,3.45) 43(-0.25,3.45) 44(-0.75,3.45) 45(-1.25,3.45) 46(-1.75,3.45) 47(-2.25,3.45) 48(-2.75,3.45)
  rect 4.2x4.2 smd: 49(0,0)
  silkscreen extent -4.62,-3.5 3.5,3.5, body extent -3.5,-3.5 3.5,3.5, height 1
QFN50P900X900X100-65N-S725 [mm] "QFN, 0.50mm Pitch, Square; 64 Pin, 9.00mm L X 9.00mm W X 1.00mm H Body (7.25 X 7.25mm Thermal Tab), IPC Medium Density"
  oval 0.9x0.3 smd: 1(-4.45,3.75) 2(-4.45,3.25) 3(-4.45,2.75) 4(-4.45,2.25) 5(-4.45,1.75) 6(-4.45,1.25) 7(-4.45,0.75) 8(-4.45,0.25) 9(-4.45,-0.25) 10(-4.45,-0.75) 11(-4.45,-1.25) 12(-4.45,-1.75) 13(-4.45,-2.25) 14(-4.45,-2.75) 15(-4.45,-3.25) 16(-4.45,-3.75) 33(4.45,-3.75) 34(4.45,-3.25) 35(4.45,-2.75) 36(4.45,-2.25) 37(4.45,-1.75) 38(4.45,-1.25) 39(4.45,-0.75) 40(4.45,-0.25) 41(4.45,0.25) 42(4.45,0.75) 43(4.45,1.25) 44(4.45,1.75) 45(4.45,2.25) 46(4.45,2.75) 47(4.45,3.25) 48(4.45,3.75)
  oval 0.3x0.9 smd: 17(-3.75,-4.45) 18(-3.25,-4.45) 19(-2.75,-4.45) 20(-2.25,-4.45) 21(-1.75,-4.45) 22(-1.25,-4.45) 23(-0.75,-4.45) 24(-0.25,-4.45) 25(0.25,-4.45) 26(0.75,-4.45) 27(1.25,-4.45) 28(1.75,-4.45) 29(2.25,-4.45) 30(2.75,-4.45) 31(3.25,-4.45) 32(3.75,-4.45) 49(3.75,4.45) 50(3.25,4.45) 51(2.75,4.45) 52(2.25,4.45) 53(1.75,4.45) 54(1.25,4.45) 55(0.75,4.45) 56(0.25,4.45) 57(-0.25,4.45) 58(-0.75,4.45) 59(-1.25,4.45) 60(-1.75,4.45) 61(-2.25,4.45) 62(-2.75,4.45) 63(-3.25,4.45) 64(-3.75,4.45)
  rect 7.25x7.25 smd: 65(0,0)
  silkscreen extent -5.19,-4.5 4.5,4.5, body extent -4.5,-4.5 4.5,4.5, height 1
RESC1005X35N [mm] "Chip Resistor, EIA 0402, Metric 1005, Body 1.0x0.5mm, IPC Medium Density"
  rect 0.58x0.62 smd: 1(-0.47,0) 2(0.47,0)
  body extent -0.52,-0.27 0.53,0.28, height 0.35
RESC1005X40N [mm] "Chip Resistor, EIA 0402, Metric 1005, Body 1.0x0.5mm, IPC Medium Density"
  rect 0.58x0.62 smd: 1(-0.47,0) 2(0.47,0)
  body extent -0.52,-0.27 0.53,0.28, height 0.4
RESC1608X55N [mm] "Chip Resistor, EIA 0603, Metric 1608, Body 1.6x0.8mm, IPC Medium Density"
  rect 0.9x1 smd: 1(-0.8,0) 2(0.8,0)
  body extent -0.87,-0.47 0.88,0.48, height 0.55
RESC3216X65N [mm] "Chip Resistor, EIA 1206, Metric 3216, Body 3.2x1.6mm, IPC Medium Density"
  rect 1.15x1.8 smd: 1(-1.45,0) 2(1.45,0)
  silkscreen extent -0.5,-0.9 0.5,0.9, body extent -1.67,-0.87 1.68,0.88, height 0.65
SOIC127P600X175-8N [mm] "SOIC 8, Pitch 1.27mm - Body 4x5mm, IPC Medium Density"
  rect 1.55x0.6 smd: 1(-2.7,1.905) 2(-2.7,0.635) 3(-2.7,-0.635) 4(-2.7,-1.905) 5(2.7,-1.905) 6(2.7,-0.635) 7(2.7,0.635) 8(2.7,1.905)
  silkscreen extent -2.53,-2.5 1.55,2.88, body extent -3.1,-2.5 3.1,2.5, height 1.75
SON50P200X300X80-11N-R94X250 [mm] "SON, 10-Leads, Body 2x3mm, Pitch 0.5mm, Thermal Pad 0.94x2.5mm, IPC Medium Density"
  rect 0.7x0.3 smd: 1(-1.05,1) 2(-1.05,0.5) 3(-1.05,0) 4(-1.05,-0.5) 5(-1.05,-1) 6(1.05,-1) 7(1.05,-0.5) 8(1.05,0) 9(1.05,0.5) 10(1.05,1)
  rect 0.94x2.5 smd: 11(0,0)
  silkscreen extent -1.5,-1.55 1.05,1.6, body extent -1.05,-1.55 1.05,1.55, height 0.8
SOP65P640X120-16N [mm] "SOP, 0.65mm pitch; 16 pin, 4.40mm W X 5.00mm L X 1.20mm H body IPC Medium Density"
  rect 1.45x0.45 smd: 1(-2.95,2.275) 2(-2.95,1.625) 3(-2.95,0.975) 4(-2.95,0.325) 5(-2.95,-0.325) 6(-2.95,-0.975) 7(-2.95,-1.625) 8(-2.95,-2.275) 9(2.95,-2.275) 10(2.95,-1.625) 11(2.95,-0.975) 12(2.95,-0.325) 13(2.95,0.325) 14(2.95,0.975) 15(2.95,1.625) 16(2.95,2.275)
  silkscreen extent -3.07,-2.55 1.85,3.17, body extent -3.12,-2.55 3.12,2.55, height 1.2
SOT95P237X112-3N [mm]
  rect 1.25x0.6 smd: 1(-1.05,0.95) 2(-1.05,-0.95) 3(1.05,0)
  silkscreen extent -1.68,-1.46 0.08,1.5, body extent -1.27,-1.46 1.27,1.46, height 1
SOT95P240X110-3N [mm] "SOT23 3-Leads, Pitch 0.95mm, Body 1.3x2.9mm, IPC Medium Density"
  rect 1.05x0.65 smd: 1(-1.15,0.95) 2(-1.15,-0.95) 3(1.15,0)
  silkscreen extent -1.52,-1.45 0.3,1.92, body extent -1.25,-1.5 1.25,1.5, height 1.1
SOT95P280X100-5N [mm] "SOT23, 0.95mm pitch; 5 pin, 1.625mm W X 2.9mm L, IPC Medium Density"
  rect 1.1x0.55 smd: 1(-1.35,0.95) 2(-1.35,0) 3(-1.35,-0.95) 4(1.35,-0.95) 5(1.35,0.95)
  silkscreen extent -1.78,-1.45 0.48,1.87, body extent -1.4,-1.5 1.4,1.5, height 1
SOT95P280X100-6N [mm] "SOT23, 0.95mm pitch; 6 pin, 1.625mm W X 2.90mm L X 1.00mm H body, IPC Medium Density"
  rect 1.1x0.55 smd: 1(-1.35,0.95) 2(-1.35,0) 3(-1.35,-0.95) 4(1.35,-0.95) 5(1.35,0) 6(1.35,0.95)
  silkscreen extent -1.77,-1.45 0.48,1.87, body extent -1.4,-1.5 1.4,1.5, height 1
SOT95P280X145-5N [mm] "SOT, 0.95mm pitch; 5 pin, 1.60mm W X 2.90mm L X 1.45mm H body, IPC Medium Density"
  rect 1.1x0.6 smd: 1(-1.3,0.95) 2(-1.3,0) 3(-1.3,-0.95) 4(1.3,-0.95) 5(1.3,0.95)
  silkscreen extent -1.72,-1.45 0.43,1.88, body extent -1.4,-1.5 1.4,1.5, height 1.45
SOT143N [mm] "SOT143, 4-Leads, Body 3.0x2.6mm (max), Pitch 1.92mm, IPC Medium Density"
  rect 1.3x1 smd: 1(-1.2,0.75)
  rect 1.3x0.6 smd: 2(-1.2,-0.95) 3(1.2,-0.95) 4(1.2,0.95)
  silkscreen extent -1.17,-1.5 0.7,1.93, body extent -1.25,-1.5 1.25,1.5, height 1.1
SOT190P230X110-4N [mm] "SOT143, SOT, 1.90mm Pitch; 4 Pin, 1.30mm W X 2.90mm L X 1.10mm H body, IPC Medium Density"
  rect 1x1 smd: 1(-1.15,0.75)
  rect 1x0.6 smd: 2(-1.15,-0.95) 3(1.15,-0.95) 4(1.15,0.95)
  silkscreen extent -1.53,-1.45 0.33,1.87, body extent -1.25,-1.5 1.25,1.5, height 1.1
TEC_CP20147H [mm]
  silkscreen extent -7.49,-7.49 7.51,7.51, body extent -7.5,-7.49 7.51,7.51, height 4
THERMC1608X90N [mm] "PTC Thermistors, Chip; 1.6mm L X 0.8mm W X 0.9mm H, IPC Medium Density"
  rect 0.95x1 smd: 1(-0.8,0) 2(0.8,0)
  body extent -0.87,-0.47 0.88,0.48, height 0.9
TPS127 [mm] "1.27 x  1.27mm SMD Test Point Area"
  rect 1.27x1.27 smd paste-1.27: 1(0,0)
  silkscreen extent -0.94,-0.94 0.94,0.94
TPS610985DSET [mm]
  rect 0.28x0.85 smd: 1(-0.5,-0.525)
  rect 0.28x0.75 smd: 2(0,-0.575) 3(0.5,-0.575) 4(0.5,0.575) 5(0,0.575) 6(-0.5,0.575)
  silkscreen extent -0.55,-1.35 -0.45,-1.25, body extent -0.75,-0.75 0.75,0.75, height 0.79
TSQFP50P1200X1200X160-64L [mm] "TSQFP, 64-Leads, Body 10.00x10.00mm, Pitch 0.50mm, IPC High Density"
  oval 1.25x0.25 smd: 1(-5.625,3.75) 2(-5.625,3.25) 3(-5.625,2.75) 4(-5.625,2.25) 5(-5.625,1.75) 6(-5.625,1.25) 7(-5.625,0.75) 8(-5.625,0.25) 9(-5.625,-0.25) 10(-5.625,-0.75) 11(-5.625,-1.25) 12(-5.625,-1.75) 13(-5.625,-2.25) 14(-5.625,-2.75) 15(-5.625,-3.25) 16(-5.625,-3.75) 33(5.625,-3.75) 34(5.625,-3.25) 35(5.625,-2.75) 36(5.625,-2.25) 37(5.625,-1.75) 38(5.625,-1.25) 39(5.625,-0.75) 40(5.625,-0.25) 41(5.625,0.25) 42(5.625,0.75) 43(5.625,1.25) 44(5.625,1.75) 45(5.625,2.25) 46(5.625,2.75) 47(5.625,3.25) 48(5.625,3.75)
  oval 0.25x1.25 smd: 17(-3.75,-5.625) 18(-3.25,-5.625) 19(-2.75,-5.625) 20(-2.25,-5.625) 21(-1.75,-5.625) 22(-1.25,-5.625) 23(-0.75,-5.625) 24(-0.25,-5.625) 25(0.25,-5.625) 26(0.75,-5.625) 27(1.25,-5.625) 28(1.75,-5.625) 29(2.25,-5.625) 30(2.75,-5.625) 31(3.25,-5.625) 32(3.75,-5.625) 49(3.75,5.625) 50(3.25,5.625) 51(2.75,5.625) 52(2.25,5.625) 53(1.75,5.625) 54(1.25,5.625) 55(0.75,5.625) 56(0.25,5.625) 57(-0.25,5.625) 58(-0.75,5.625) 59(-1.25,5.625) 60(-1.75,5.625) 61(-2.25,5.625) 62(-2.75,5.625) 63(-3.25,5.625) 64(-3.75,5.625)
  silkscreen extent -5.75,-4.95 4.93,4.95, body extent -6,-6 6,6, height 1.6
TYCO_786585-2 [mm] "50SR SCREWLOCK KIT, FEMALE"
  silkscreen extent -4.04,-2.74 5.26,2.74, body extent -9.01,-2.74 5.26,2.74, height 6.77
TYCO_5787082-7 [mm] "68 contacts, AMPLIMITE .050\", Right Angled Receptacle Series III"
  round 1.6 hole 0.9: 1(20.955,0.952) 2(19.685,2.858) 3(18.415,0.952) 4(17.145,2.858) 5(15.875,0.952) 6(14.605,2.858) 7(13.335,0.952) 8(12.065,2.858) 9(10.795,0.952) 10(9.525,2.858) 11(8.255,0.952) 12(6.985,2.858) 13(5.715,0.952) 14(4.445,2.858) 15(3.175,0.952) 16(1.905,2.858) 17(0.635,0.952) 18(-0.635,2.857) 19(-1.905,0.952) 20(-3.175,2.857) 21(-4.445,0.952) 22(-5.715,2.857) 23(-6.985,0.952) 24(-8.255,2.857) 25(-9.525,0.952) 26(-10.795,2.857) 27(-12.065,0.952) 28(-13.335,2.857) 29(-14.605,0.952) 30(-15.875,2.857) 31(-17.145,0.952) 32(-18.415,2.857) 33(-19.685,0.952) 34(-20.955,2.857) 35(20.955,-2.858) 36(19.685,-0.953) 37(18.415,-2.858) 38(17.145,-0.953) 39(15.875,-2.858) 40(14.605,-0.953) 41(13.335,-2.858) 42(12.065,-0.953) 43(10.795,-2.858) 44(9.525,-0.953) 45(8.255,-2.858) 46(6.985,-0.953) 47(5.715,-2.858) 48(4.445,-0.953) 49(3.175,-2.858) 50(1.905,-0.953) 51(0.635,-2.858) 52(-0.635,-0.953) 53(-1.905,-2.858) 54(-3.175,-0.953) 55(-4.445,-2.858) 56(-5.715,-0.953) 57(-6.985,-2.858) 58(-8.255,-0.953) 59(-9.525,-2.858) 60(-10.795,-0.953) 61(-12.065,-2.858) 62(-13.335,-0.953) 63(-14.605,-2.858) 64(-15.875,-0.953) 65(-17.145,-2.858) 66(-18.415,-0.953) 67(-19.685,-2.858) 68(-20.955,-0.953)
  round 3.5 hole 2.8: 69(-28.955,-0.953) 70(28.955,-0.952)
  silkscreen extent -31.94,-12.74 31.94,5.05, body extent -31.94,-12.74 31.94,4.13, height 9.5

## Part data
B1 B7: library part PLATED_HOLE2.7_PAD5.0, "Single Terminal Socket", Author="CERN DEM JMW", ComponentHeight=0mm, Component Type="Standard (No BOM)", CreateDate=27.09.2011, Family="Plated Hole", HelpURL=Undefined, LatestRevisionDate=27.09.2011, Mounted=No, PackageDescription="Plated Through Hole: Hole Dia.=2.7mm Pad Dia.=5.0mm", Part Description="Plated Through Hole: Hole Dia.=2.7mm Pad Dia.=5.0mm", Part Number=PLATED_HOLE2.7_PAD5.0, Pin Count=1, Sense=No, SMD=No, Socket=No, Status=None
B2 B3 B4 B8 B9 B10: library part PLATED_HOLE0.8_PAD1.3, "Single Terminal Socket", Author="CERN DEM JLC", ComponentHeight=0mm, Component Type="Standard (No BOM)", CreateDate=30.10.2008, Family="Plated Hole", HelpURL=Undefined, LatestRevisionDate=30.10.2008, Mounted=No, PackageDescription="Plated Through Hole: Hole Dia.=0.8mm Pad Dia.=1.3mm, IPC-7251 Level C", Part Description="Plated Through Hole: Hole Dia.=0.8mm Pad Dia.=1.3mm, IPC-7251 Level C", Part Number=PLATED_HOLE0.8_PAD1.3, Pin Count=1, Sense=No, SMD=No, Socket=No, Status=None
B5 B6: library part PLATED_HOLE1.1_PAD1.6, "Single Terminal Socket", Author="CERN DEM JLC", ComponentHeight=0mm, Component Type="Standard (No BOM)", CreateDate=30.10.2008, Family="Plated Hole", HelpURL=Undefined, LatestRevisionDate=30.10.2008, Mounted=No, PackageDescription="Plated Through Hole: Hole Dia.=1.1mm Pad Dia.=1.6mm, IPC-7251 Level C", Part Description="Plated Through Hole: Hole Dia.=1.1mm Pad Dia.=1.6mm, IPC-7251 Level C", Part Number=PLATED_HOLE1.1_PAD1.6, Pin Count=1, Sense=No, SMD=No, Socket=No, Status=None
C1 C2 C3 C7 C10 C12 C14 C47 C79 C90_1 C90_2 C90_3 C90_4 C90_5 C90_6 C90_7 C90_8 C90_9 C90_10 C90_11 C90_12 C90_13 C90_14 C90_15 C90_16 C90_17 C90_18 C90_19 C90_20 C90_21 C90_22 C90_23 C90_24 C90_25 C90_26 C90_27 C90_28 C90_29 C90_30 C90_31 C90_32 C93_1 C93_2 C93_3 C93_4 C93_5 C93_6 C93_7 C93_8 C93_9 C93_10 C93_11 C93_12 C93_13 C93_14 C93_15 C93_16 C93_17 C93_18 C93_19 C93_20 C93_21 C93_22 C93_23 C93_24 C93_25 C93_26 C93_27 C93_28 C93_29 C93_30 C93_31 C93_32 C124 C132 C134 C136 C147: library part CTE3216-18_10UF_16V_20%_AVX_TCJ, "Polarised capacitor", Case=A, Manufacturer=AVX, Manufacturer Part Number=TCJA106M016R0200, Tolerance=±20%, Voltage=16V, Author="CERN DEM JLC", ComponentHeight=1.8mm, Component Type=Standard, CreateDate=29.03.2012, HelpURL=\\cern.ch\dfs\Applications\Altium\Datasheets\CTE_AVX_TCJ.pdf, LatestRevisionDate=29.03.2012, Mounted=Yes, Part Description="ESR 0R200 Tantalum Solid Electrolytic Chip Capacitor with Conductive Polymer Electrode", Part Number=CTE3216-18_10UF_16V_20%_AVX_TCJ, Pin Count=2, Sense=No, SMD=Yes, Socket=No, Status=Preferred
C4 C5 C16 C17 C19 C20 C21 C22 C23 C24 C30 C34 C35 C37 C38 C69 C70 C148 C150: library part CC0402_100NF_16V_10%_X5R, "Non-polarised capacitor", Case=0402, Manufacturer=GENERIC, Manufacturer1 ComponentHeight=0.55mm, Manufacturer1 Example=MURATA, Manufacturer1 Part Number=GRM155R61C104KA88D, Tolerance=±10%, Voltage=16V, Author="CERN DEM JLC", Component Type=Standard, CreateDate=10.12.2013, HelpURL=\\cern.ch\dfs\Applications\Altium\Datasheets\CC0402_X5R_MURATA_GRM.pdf, LatestRevisionDate=10.12.2013, Manufacturer Part Number=CC0402_100NF_16V_10%_X5R, Mounted=Yes, Part Description="SMD Multilayer Chip Ceramic Capacitor", Part Number=CC0402_100NF_16V_10%_X5R, Pin Count=2, Sense=No, SMD=Yes, Socket=No, Status=None, TC=X5R
C6 C27 C64: library part CC0603_10NF_50V_10%_X7R, "Non-polarised capacitor", Case=0603, Manufacturer=GENERIC, Manufacturer1 ComponentHeight=0.87mm, Manufacturer1 Example=PHYCOMP, Manufacturer1 Part Number=223858615636, Tolerance=±10%, Voltage=50V, Author="CERN DEM JLC", Component Type=Standard, CreateDate=03.12.2007, HelpURL=\\cern.ch\dfs\Applications\Altium\Datasheets\CC0603_X7R_PHYCOMP.pdf, LatestRevisionDate=03.12.2007, Manufacturer Part Number=CC0603_10NF_50V_10%_X7R, Mounted=Yes, Part Description="SMD Multilayer Chip Ceramic Capacitor", Part Number=CC0603_10NF_50V_10%_X7R, Pin Count=2, Sense=No, SMD=Yes, Socket=No, Status=Preferred, TC=X7R
C8 C18 C25 C26 C129 C130 C131 C137 C138 C139 C140 C141 C142 C149 C151: library part CC0805_22UF_16V_10%_X5R, "Non-polarised capacitor", Case=0805, Manufacturer=GENERIC, Manufacturer1 ComponentHeight=1.35mm, Manufacturer1 Example=TDK, Manufacturer1 Part Number=C2012X5R1C226KT, Tolerance=±10%, Voltage=16V, Author="CERN DEM JLC", Component Type=Standard, CreateDate=25.10.2012, HelpURL=\\cern.ch\dfs\Applications\Altium\Datasheets\CC0805_X5R_TDK_C.pdf, LatestRevisionDate=25.10.2012, Manufacturer Part Number=CC0805_22UF_16V_10%_X5R, Mounted=Yes, Part Description="SMD Multilayer Chip Ceramic Capacitor", Part Number=CC0805_22UF_16V_10%_X5R, Pin Count=2, Sense=No, SMD=Yes, Socket=No, Status=Preferred, TC=X5R
C9 C13 C31 C33 C50 C53 C78 C83 C91_1 C91_2 C91_3 C91_4 C91_5 C91_6 C91_7 C91_8 C91_9 C91_10 C91_11 C91_12 C91_13 C91_14 C91_15 C91_16 C91_17 C91_18 C91_19 C91_20 C91_21 C91_22 C91_23 C91_24 C91_25 C91_26 C91_27 C91_28 C91_29 C91_30 C91_31 C91_32 C92_1 C92_2 C92_3 C92_4 C92_5 C92_6 C92_7 C92_8 C92_9 C92_10 C92_11 C92_12 C92_13 C92_14 C92_15 C92_16 C92_17 C92_18 C92_19 C92_20 C92_21 C92_22 C92_23 C92_24 C92_25 C92_26 C92_27 C92_28 C92_29 C92_30 C92_31 C92_32: library part CC0402_100NF_16V_10%_X7R, "Non-polarised capacitor", Case=0402, Manufacturer=GENERIC, Manufacturer1 ComponentHeight=0.55mm, Manufacturer1 Example=MURATA, Manufacturer1 Part Number=GRM155R71C104KA88D, Tolerance=±10%, Voltage=16V, Author="CERN DEM JLC", Component Type=Standard, HelpURL=\\cern.ch\dfs\Applications\Altium\Datasheets\CC0402_X7R_MURATA_GRM.pdf, Manufacturer Part Number=CC0402_100NF_16V_10%_X7R, Mounted=Yes, Part Description="SMD Multilayer Chip Ceramic Capacitor", Part Number=CC0402_100NF_16V_10%_X7R, Pin Count=2, Sense=No, SMD=Yes, Socket=No, Status="Not Recommended", TC=X7R
  C9 C78 C91_1 C91_2 C91_3 C91_4 C91_5 C91_6 C91_7 C91_8 C91_9 C91_10 C91_11 C91_12 C91_13 C91_14 C91_15 C91_16 C91_17 C91_18 C91_19 C91_20 C91_21 C91_22 C91_23 C91_24 C91_25 C91_26 C91_27 C91_28 C91_29 C91_30 C91_31 C91_32 C92_1 C92_2 C92_3 C92_4 C92_5 C92_6 C92_7 C92_8 C92_9 C92_10 C92_11 C92_12 C92_13 C92_14 C92_15 C92_16 C92_17 C92_18 C92_19 C92_20 C92_21 C92_22 C92_23 C92_24 C92_25 C92_26 C92_27 C92_28 C92_29 C92_30 C92_31 C92_32: CreateDate=2013-12-05, LatestRevisionDate=2007-12-03
  C13 C31 C33 C50 C53 C83: CreateDate=05.12.2013, LatestRevisionDate=03.12.2007
C11 C15: library part CC0805_NO-VALUE, "Non-polarised capacitor", Case=0805, Manufacturer1 ComponentHeight=1.35mm, Author="CERN DEM JLC", Component Type=Standard, CreateDate=10.12.2008, HelpURL=Undefined, LatestRevisionDate=11.09.2013, Manufacturer=Undefined, Manufacturer Part Number=CC0805_NO-VALUE, Mounted=No, Part Description="Reserved Footprint For 0805(2012) Chip Ceramic Capacitor", Part Number=CC0805_NO-VALUE, Pin Count=2, Sense=No, SMD=Yes, Socket=No, Status=None